# Altium PCB SMSP_PCB.PcbDoc
Units mil, origin at the board's own origin, x right, y up, seen from the top; angles counter-clockwise.
Board outline 3985.03 x 2845.03 mil, 2 copper layers (Top Layer, Bottom Layer); 19 components, 17 nets, 87 pads, 4 vias.
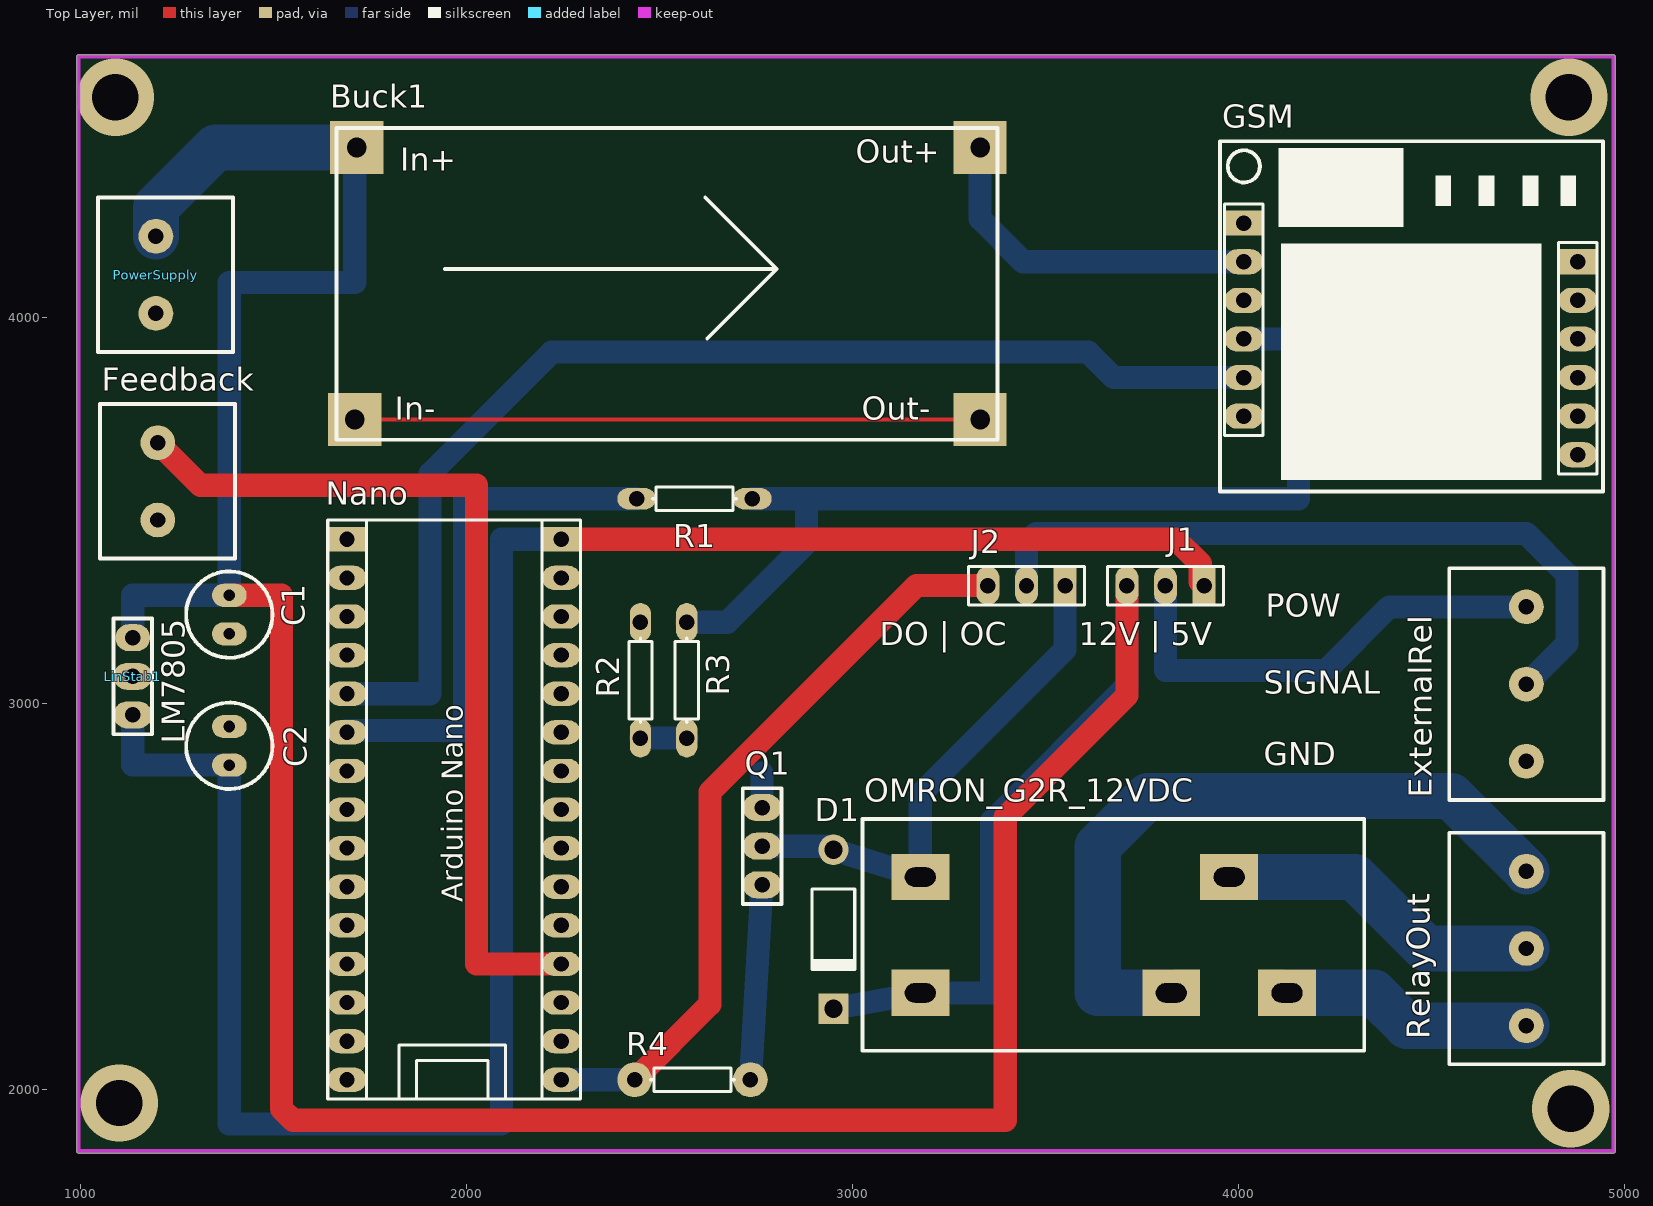
[diagram p0: Top Layer view]
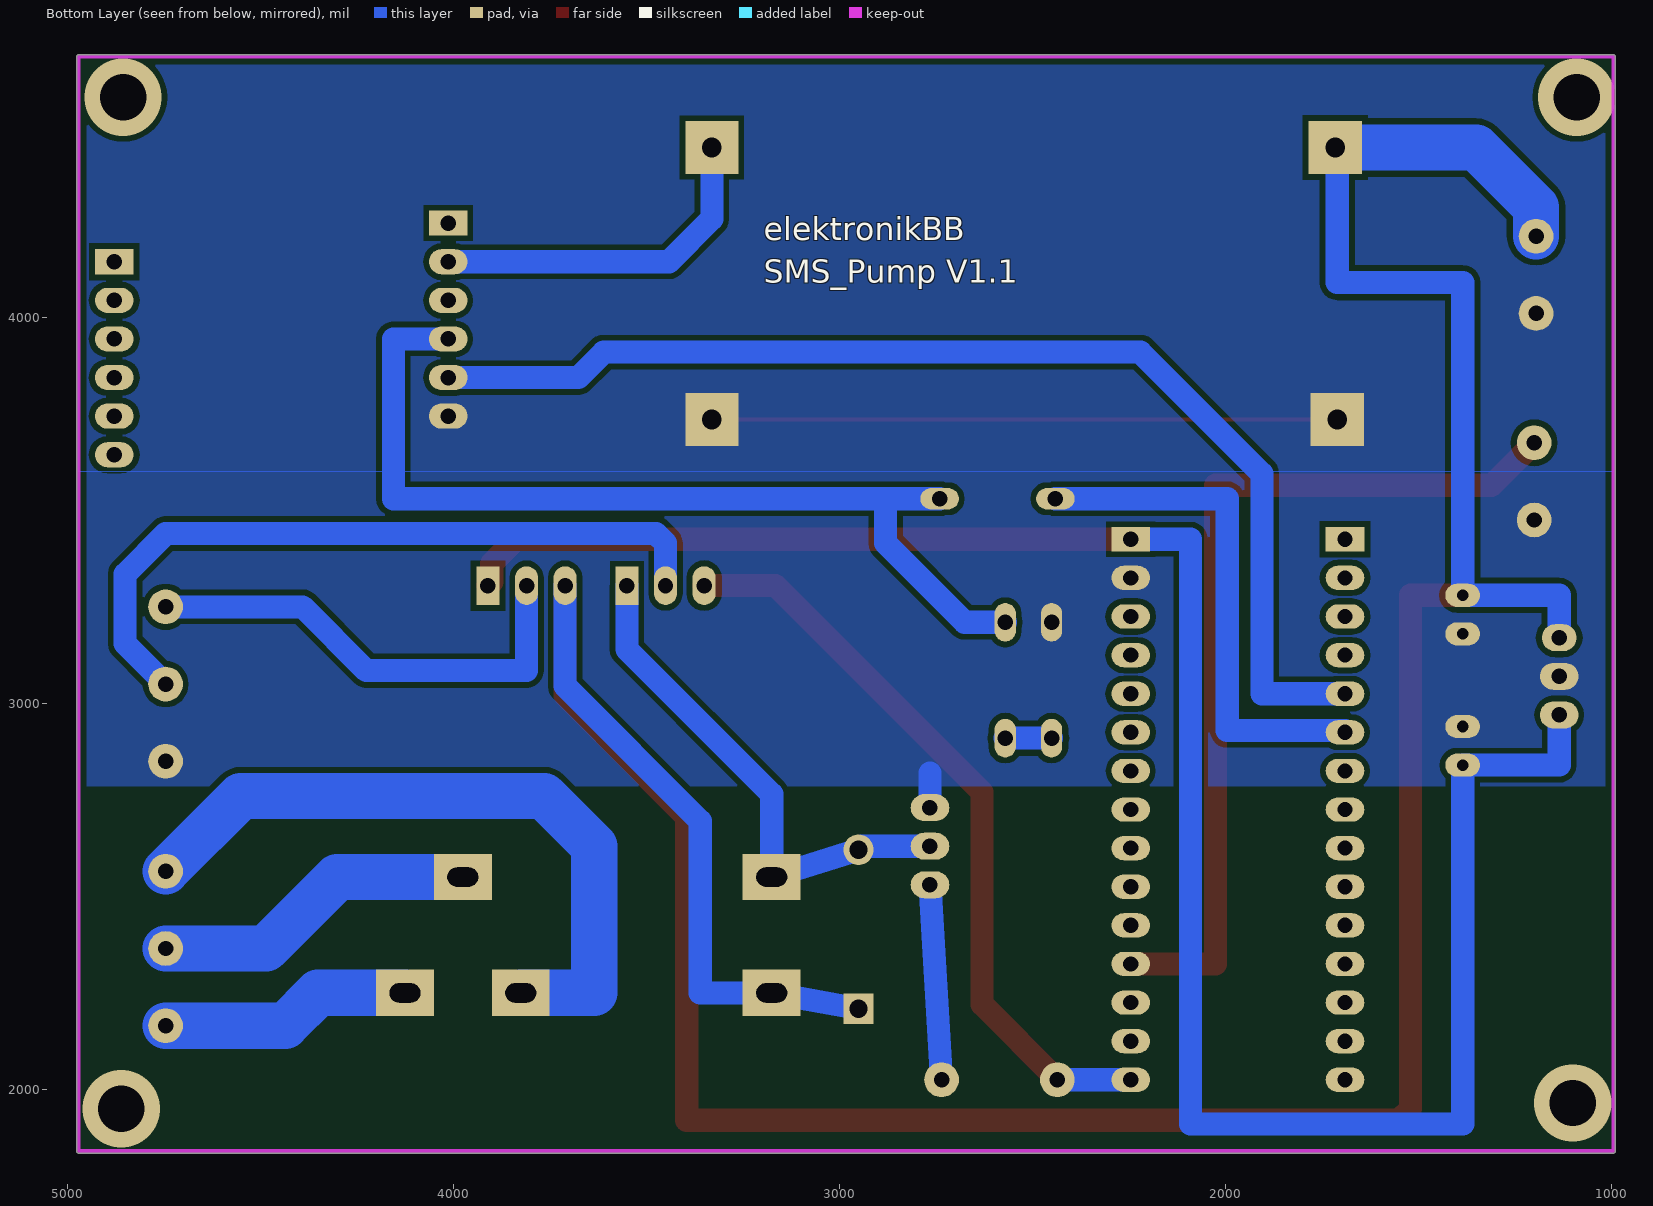
[diagram p1: Bottom Layer view, seen from below]

## Layer stack, top to bottom
Top Layer: signal copper 1.4
Dielectric: dielectric 12.6, FR-4, Dk 4.8
Bottom Layer: signal copper 1.4

## Board outline
995,1834.98 cw(c995,1840) 989.99,1840 989.99,4675 cw(c995,4675) 995,4680.02 4970,4680.02 cw(c4970,4675) 4975.02,4675 4975.02,1840 cw(c4970,1840) 4970,1834.98

## Design rules (kind name [scope] priority, off if disabled: settings)
Clearance [All] p1: gap=15
PolygonConnect [All] p1: connectstyle=Direct reliefconductorwidth=10 reliefentries=4 polygonreliefangle="90 Angle" airgapwidth=10
RoutingVias [All] p1: holewidth=28 width=50 viastyle="Through Hole" minholewidth=28 minwidth=50 maxholewidth=28 maxwidth=50
SolderMaskExpansion [All] p1: expansion=4
Width [All] p1: maxlimit=150 minlimit=10 preferedwidth=50 toplayer_prefwidth=40 bottomlayer_minwidth=40 minimp=50.000000 maximp=50.000000 favimp=50.000000
28 further rules are at their usual default settings.

## Components (designator, comment, footprint, x,y, rotation, side; value= is the part's Value field where it differs from the comment)
Buck1 "LM2596-Adj" lm2596 2365,4005 r0 top
C1 "Cap Pol1" Electrolytic_Capacitor 1385,3230 r270 top
C2 "Cap Pol1" Electrolytic_Capacitor 1385,2890 r90 top
D1 "Diode 1N4007" DO-41 2950,2415 r270 top
ExternalRel "klema" klema3 4745,3050 r0 top
Feedback "Klema" Klema 1200,3575 r270 top
GSM "Sim800L" Sim800L 3950,4445 r0 top
J1 "Header 3" HDR1X3 3910,3305 r180 top
J2 "Header 3" HDR1X3 3550,3305 r180 top
LinStab1 "LM7805" LM7805 1135,3070 r270 top
Nano "mcu" ArduinoNano 1960,2685 r90 top
OMRON_G2R_12VDC "12V Relay" OMRON_G2R 3275,2450 r0 top
PowerSupply "Klema" Klema 1195,4110 r270 top
Q1 "BD139" BD139 2765,2630 r270 top
R1 "Res1" AXIAL-0.3#1 2590,3530 r180 top
R2 "Res1" AXIAL-0.3#1 2570,3060 r90 top
R3 "Res1" AXIAL-0.3#1 2450,3060 r270 top
R4 "Res1" AXIAL-0.3#2 2585,2025 r0 top
RelayOut "klema" klema3 4745,2365 r180 top

## Footprints (in the part's own frame and the unit in brackets; to place one, negate y for a bottom-side part, rotate by r counter-clockwise, add the part's x,y. Pads: shape width x height; smd on the part's side, far side on the other; paste and mask are expansions set on the pad)
ArduinoNano [mil] "Footprint from Github"
  rect 62.99x100 hole 39.37: 1(740,270) 30(740,-285)
  oval 62.99x100 hole 39.37: 2(640,270) 3(540,270) 4(440,270) 5(340,270) 6(240,270) 7(140,270) 8(40,270) 9(-60,270) 10(-160,270) 11(-260,270) 12(-360,270) 13(-460,270) 14(-560,270) 15(-660,270) 16(-660,-285) 17(-560,-285) 18(-460,-285) 19(-360,-285) 20(-260,-285) 21(-160,-285) 22(-60,-285) 23(40,-285) 24(140,-285) 25(240,-285) 26(340,-285) 27(440,-285) 28(540,-285) 29(640,-285)
  silkscreen extent -710,-335 790,320
AXIAL-0.3#1 [mil] "Axial Device, Thru-Hole; 2 Leads; 0.3 in Pin Spacing"
  oval 100x55.12 hole 40: 1(-150,0) 2(150,0)
  silkscreen extent -109,-30 109,30
AXIAL-0.3#2 [mil] "Axial Device, Thru-Hole; 2 Leads; 0.3 in Pin Spacing"
  round 90 hole 40: 1(-150,0) 2(150,0)
  silkscreen extent -109,-30 109,30
BD139 [mil]
  oval 70x100 hole 40: 1(0,0) 2(-100,0) 3(100,0)
  silkscreen extent -150,-50 150,50
DO-41 [mm] "Diode, Axial; Body 5.2 x 2.7 mm (LxDia. max), Lead Dia. 0.86 mm (max)"
  round 2 hole 1.2: 1(-5.23,0)
  rect 2x2 hole 1.2: 2(5.23,0)
  silkscreen extent -2.65,-1.4 2.75,1.4
Electrolytic_Capacitor [mil]
  oval 60x90 hole 30: 1(-50,0) 2(50,0)
  silkscreen extent -112,-112 112,112
HDR1X3 [mil] "Connector; Header; 3 Position"
  rect 60x100 hole 40: 1(0,0)
  oval 60x100 hole 40: 2(100,0) 3(200,0)
  silkscreen extent -50,-50 250,50
Klema [mil]
  round 90 hole 40: 1(-100,0) 2(100,0)
  silkscreen extent -200,-150 200,200
klema3 [mil]
  round 90 hole 40: 1(0,200) 2(0,0) 3(0,-200)
  silkscreen extent -200,-300 200,300
lm2596 [mm]
  rect 3.5x3.5 hole 1.3: 1(-16.51,11.049) 2(-16.637,-6.858) 3(24.511,-6.858) 4(24.511,11.049)
  silkscreen extent -17.85,-8.18 25.65,12.32, body extent -17.81,-8.21 25.69,12.79, height 13.68
LM7805 [mil]
  oval 70x90 hole 40: 1(-100,0)
  oval 70x100 hole 40: 2(0,0) 3(100,0)
  silkscreen extent -150,-50 150,50
OMRON_G2R [mil]
  rect 150x120 hole 50 slot 80 at 0 deg: 1(-100,-200) 2(550,-200) 3(850,-200) 4(700,100) 5(-100,100)
  silkscreen extent -250,-350 1050,250
Sim800L [mil]
  rect 100x65 hole 40: 1(63,-201) 7(928,-301)
  oval 100x65 hole 40: 2(63,-301) 3(63,-401) 4(63,-501) 5(63,-601) 6(63,-701) 8(928,-401) 9(928,-501) 10(928,-601) 11(928,-701) 12(928,-801)
  silkscreen extent 1,-896 993,11, body extent 5,-905 989,5, height 398

## Part data
Buck1: "Designed By @Alixahedi"
C1 C2: "Polarized Capacitor (Radial)"
D1: "1 Amp General Purpose Rectifier"
ExternalRel RelayOut: library part klema3
Feedback PowerSupply: "2 pina"
J1 J2: "Header, 3-Pin"
LinStab1: "Stabilizator"
Nano: library part ArduinoNano, "Arduino Nano from Microchip"
OMRON_G2R_12VDC: library part OMRON_G2R_12VDC
R1 R2 R3 R4: "Resistor"

## Via types
v1: diameter 200, hole 120, Top Layer to Bottom Layer, 4 vias

## Nets (pads, with @x,y where several pads share a name; then routed paths per layer and width w, separated by ;. In a path a pad name is that pad's centre, name@x,y a point inside that pad or via, vN(x,y) a via of type N, cw(c..) or ccw(c..) an arc to the next point about the centre after c; other vN are vias at no path point)
4V: Buck1.4 GSM.2 | length 914
  Bottom Layer w60: Buck1.4 3330,4255 3441,4144 GSM.2
5V: C2.1 J1.1 LinStab1.3 Nano.30 | length 5427.4
  Top Layer w60: Nano.30 3837.28,3425 3900,3362.28 3900,3315 J1.1
  Bottom Layer w60: LinStab1.3 1135,2840 C2.1 1385,1910 2090,1910 2090,3425 Nano.30
EXTRELAYOUT: ExternalRel.2 J2.2 | length 1892.3
  Bottom Layer w60: J2.2 3450,3415 3475,3440 4745,3440 4850,3335 4850,3155 ExternalRel.2
GND: Buck1.2 Buck1.3 C1.2 C2.2 ExternalRel.3 Feedback.2 GSM.6 LinStab1.2 Nano.29 PowerSupply.2 Q1.2 R3.1 | length 1710
  Top Layer w10: Buck1.2 Buck1.3
  Bottom Layer w60: Q1.2 2765,2820
NetExternalRel_1: ExternalRel.1 J1.2 | length 1223.3
  Bottom Layer w60: J1.2 3810,3085 4225,3085 4390,3250 ExternalRel.1
NetFeedback_1: Feedback.1 Nano.19 | length 2330.6
  Top Layer w60: Feedback.1 1310,3565 2025,3565 2025,2325 Nano.19
NetGSM_4: GSM.4 R1.1 R2.2 | length 2480.9
  Bottom Layer w60: R2.2 2675,3210 2880,3415 2880,3530 ; R1.1 2880,3530 ; GSM.4 4155,3944 4155,3530 2880,3530
NetGSM_5: GSM.5 Nano.5 | length 3050.8
  Bottom Layer w60: Nano.5 1905,3025 1905,3595 2220,3910 3610,3910 3676,3844 GSM.5
NetNano_6: Nano.6 R1.2 | length 1355
  Bottom Layer w60: Nano.6 1690,2930 1995,2930 1995,3530 R1.2
NetOMRON_G2R_12VDC_2: OMRON_G2R_12VDC.2 RelayOut.3 | length 1814.6
  Bottom Layer w120: OMRON_G2R_12VDC.2 3635,2250 3635,2630 3765,2760 4550,2760 RelayOut.3
NetOMRON_G2R_12VDC_3: OMRON_G2R_12VDC.3 RelayOut.1 | length 655.2
  Bottom Layer w120: OMRON_G2R_12VDC.3 4350,2250 4435,2165 RelayOut.1
NetOMRON_G2R_12VDC_4: OMRON_G2R_12VDC.4 RelayOut.2 | length 846.6
  Bottom Layer w120: OMRON_G2R_12VDC.4 4300,2550 4485,2365 RelayOut.2
NetQ1_3: Q1.3 R4.2 | length 505.9
  Bottom Layer w60: R4.2 Q1.3
NetR2_1: R2.1 R3.2 | length 120
  Bottom Layer w60: R3.2 R2.1
Q_OUTPUT: D1.1 J2.1 OMRON_G2R_12VDC.5 Q1.1 | length 1335
  Bottom Layer w60: Q1.1 2940.91,2630 D1.1 OMRON_G2R_12VDC.5 3175,2765 3550,3140 J2.1
RELAYOUT: J2.3 Nano.16 R4.1 | length 1957.4
  Top Layer w60: R4.1 2630,2220 2630,2770 3165,3305 J2.3
  Bottom Layer w60: Nano.16 R4.1
VCC: Buck1.1 C1.1 D1.2 J1.3 LinStab1.1 OMRON_G2R_12VDC.1 PowerSupply.1 | length 8985.8
  Top Layer w60: C1.1 1520,3280 1520,1950 1550,1920 3395,1920 3395,2705 3710,3020 J1.3
  Bottom Layer w60: LinStab1.1 1135,3280 C1.1 1385,4090 1710,4090 1710,4440 Buck1.1 ; D1.2 OMRON_G2R_12VDC.1 3360,2250 3360,2695 3710,3045 J1.3
  Bottom Layer w120: PowerSupply.1 1195,4285 1350,4440 Buck1.1@1710,4440
pads on no net: GSM.1 GSM.3 GSM.7 GSM.8 GSM.9 GSM.10 GSM.11 GSM.12 Nano.1 Nano.2 Nano.3 Nano.4 Nano.7 Nano.8 Nano.9 Nano.10 Nano.11 Nano.12 Nano.13 Nano.14 Nano.15 Nano.17 Nano.18 Nano.20 Nano.21 Nano.22 Nano.23 Nano.24 Nano.25 Nano.26 Nano.27 Nano.28
copper on no net:
  other v1: 4860,1950 1100,1965 1090,4570 4855,4570

## Polygon pours and split planes (outlines as drawn)
GND on Bottom Layer "Bottom Layer-No Net" (solid, remove dead copper, pour order 20): 995,4665 4955,4665 4955,3350 4955,2785 990,2785
GND on Bottom Layer "Bottom Layer-No Net" (solid, remove dead copper, shelved, pour order 18): 995,4675 995,3600 4970,3600 4970,4675

## Keep-outs
Keep-Out Layer:
  lines w10: 1635,1840 4970,1840 4970,4675 995,4675 995,1840 1640,1840

## Silkscreen, mask and mechanical layers (free items; w line width, h text height)
Top Overlay:
  text "POW" at 4070,3225 h60
  text "DO | OC" at 3070,3150 h60
  text "12V | 5V" at 3585,3150 h60
  text "SIGNAL" at 4065,3025 h60
  text "LM7805" at 1270,2895 h60 r90
  text "GND" at 4065,2840 h60
Bottom Overlay:
  text "elektronikBB" at 3195,4200 h60
  text "SMS_Pump V1.1" at 3195,4090 h60

## Text inside footprints (layer, text, board x,y; h text height)
Buck1: Top Overlay "In+" at 1828,4380 h60; Top Overlay "In-" at 1813,3735 h60; Top Overlay "Out-" at 3023,3735 h60; Top Overlay "Out+" at 3008,4400 h60
Nano: Top Overlay "Arduino Nano" at 1990,2485 h55.12 r90